# Altium PCB V1.0.pcbdoc
Units mil, origin at the board's own origin, x right, y up, seen from the top; angles counter-clockwise.
Board outline 3149.6 x 1850.4 mil, 2 copper layers (Top Layer, Bottom Layer), stack 62.2 mil thick; 47 components, 71 nets, 213 pads, 34 vias.
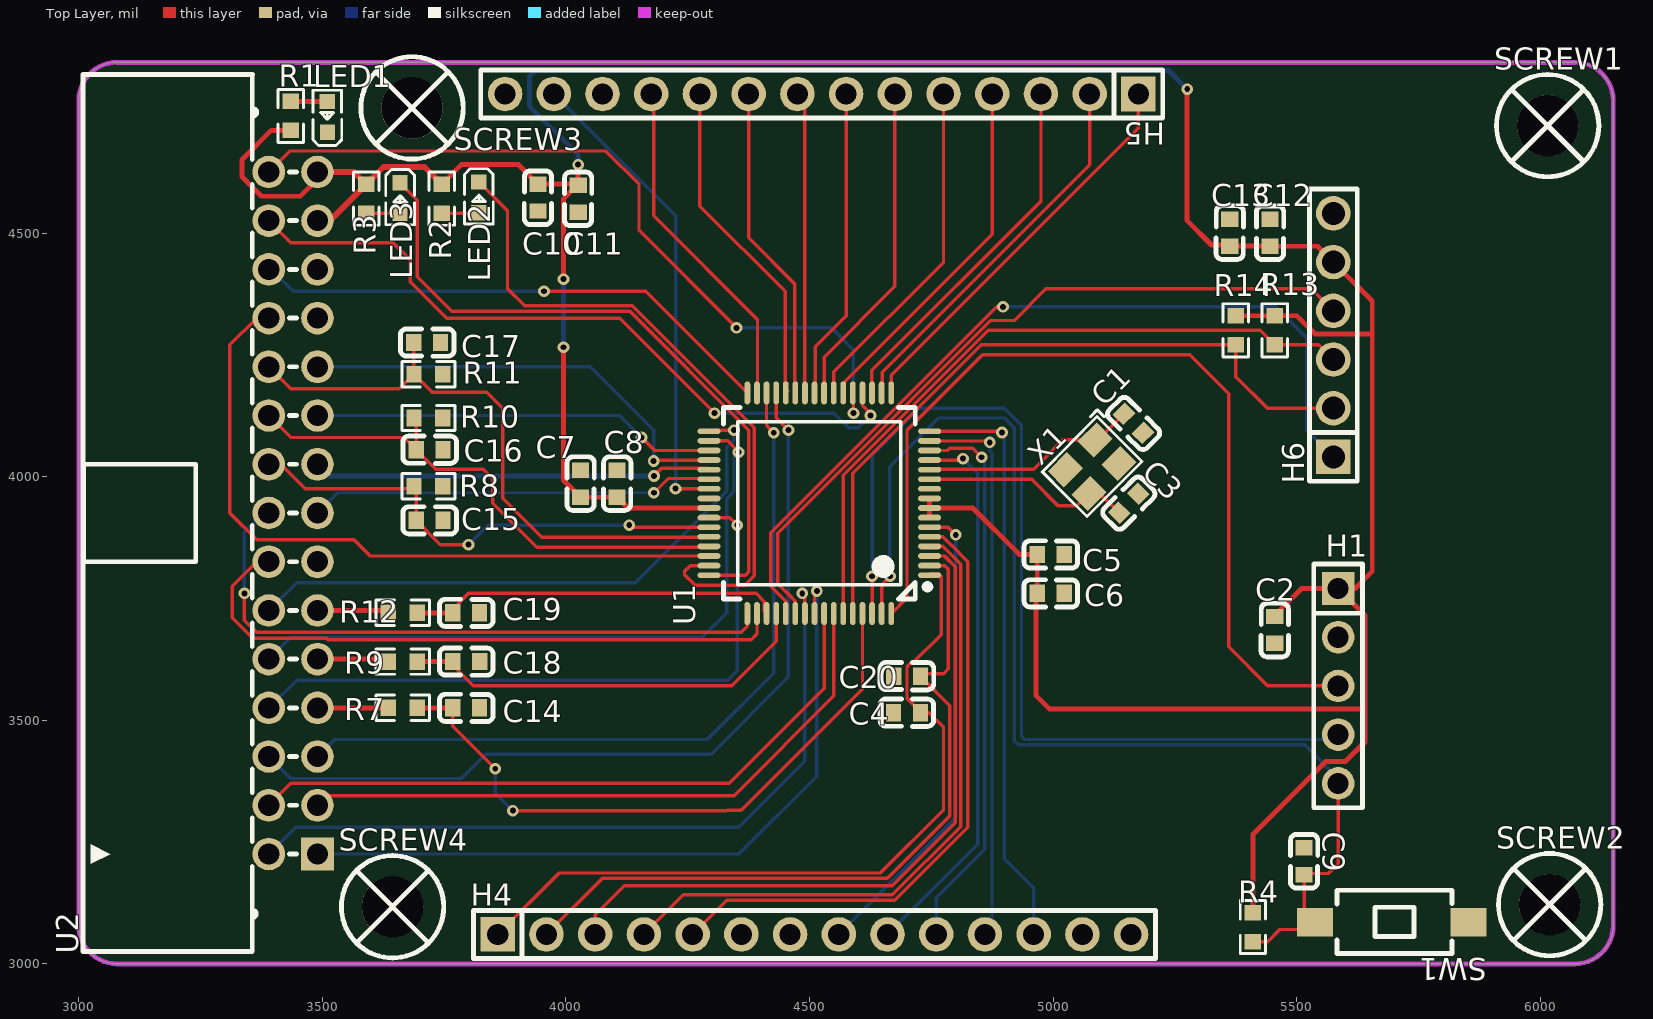
[diagram p0: Top Layer view]
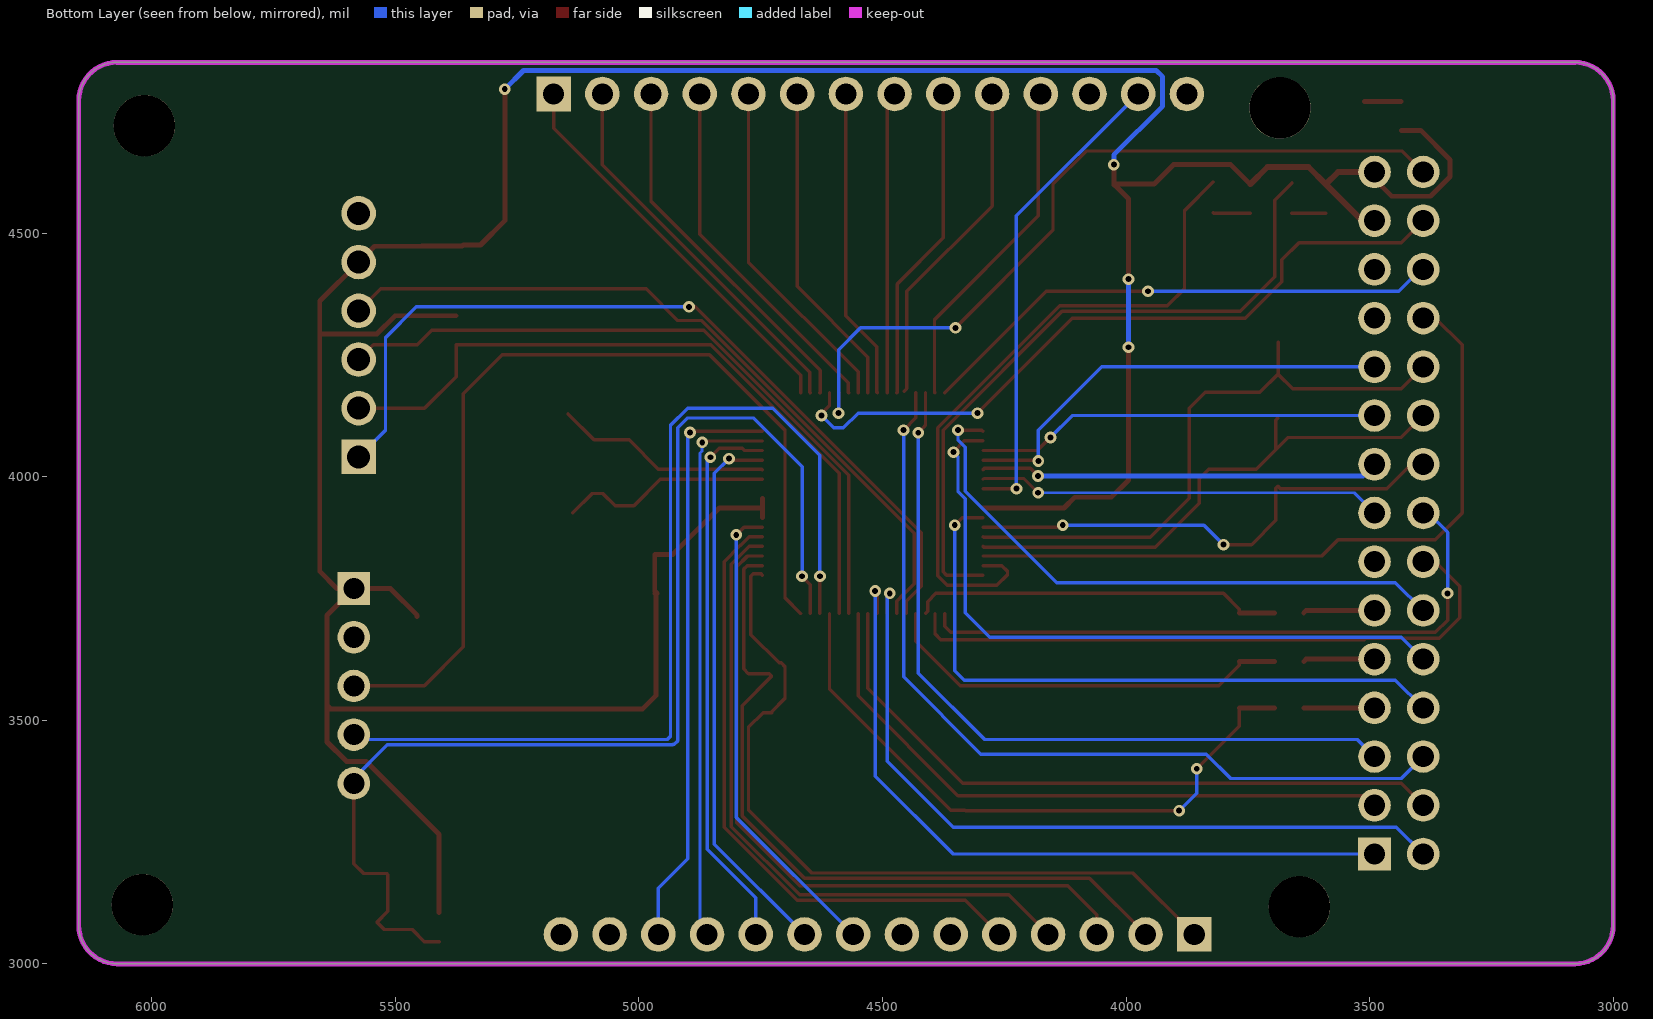
[diagram p1: Bottom Layer view, seen from below]

## Layer stack, top to bottom
Top Solder Mask Layer: solder mask 0.4, Dk 3.3
Top Layer: signal copper 1.4
Dielectric1: surface 59.4, FR4, Dk 4.5
Bottom Layer: signal copper 1.4
Bottom Solder Mask Layer: solder mask 0.4, Dk 3.3

## Board outline
3078.7,4850.4 ccw(c3078.7,4771.7) 3000,4771.7 3000,3078.7 ccw(c3078.7,3078.7) 3078.7,3000 6070.9,3000 ccw(c6070.9,3078.7) 6149.6,3078.7 6149.6,4771.7 ccw(c6070.9,4771.7) 6070.9,4850.4 3078.7,4850.4

## Design rules (kind name [scope] priority, off if disabled: settings)
BoardOutlineClearance copperThickness1oz [All] p0: genericclearance=10 ignorepadtopadclearanceinfootprint=FALSE except(0: Arc-SplitContinuation Track-SplitContinuation SMDPad-SplitContinuation THPad-SplitContinuation Via-SplitContinuation Fill-SplitContinuation Poly-SplitContinuation Region-SplitContinuation Text-SplitContinuation)
BoardOutlineClearance copperThickness2oz [All] p0: genericclearance=10 ignorepadtopadclearanceinfootprint=FALSE except(0: Arc-SplitContinuation Track-SplitContinuation SMDPad-SplitContinuation THPad-SplitContinuation Via-SplitContinuation Fill-SplitContinuation Poly-SplitContinuation Region-SplitContinuation Text-SplitContinuation)
BoardOutlineClearance otherClearance [All] p0: genericclearance=10 ignorepadtopadclearanceinfootprint=FALSE except(0: Arc-SplitContinuation Track-SplitContinuation SMDPad-SplitContinuation THPad-SplitContinuation Via-SplitContinuation Fill-SplitContinuation Poly-SplitContinuation Region-SplitContinuation Text-SplitContinuation)
Clearance copperThickness1oz [All] p1: gap=7 ignorepadtopadclearanceinfootprint=FALSE
Clearance copperThickness2oz [All] p1: gap=7 ignorepadtopadclearanceinfootprint=FALSE
Clearance otherClearance [All] p1: gap=7 ignorepadtopadclearanceinfootprint=FALSE
DiffPairsRouting differentialPair [All] p1: maxuncoupledlength=10 minlimit=6 maxlimit=Infinity mostfreqgap=6 toplayer_minwidth=5 toplayer_prefwidth=10 toplayer_maxwidth=100 bottomlayer_minwidth=5 bottomlayer_prefwidth=10 bottomlayer_maxwidth=100
PasteMaskExpansion pasteMaskExpansion [All] p1: expansion=0
PlaneConnect innerPlane [All] p1: planeconnectstyle=Relief reliefexpansion=20 reliefentries=4 reliefconductorwidth=10 reliefairgap=10
PolygonConnect copperRegion [All] p1: connectstyle=Relief reliefentries=4 reliefconductorwidth=10 polygonreliefangle="90 Angle" airgapwidth=10
RoutingVias viaSize [All] p1: viastyle="Through Hole" holewidth=12 minholewidth=6 maxholewidth=248.0314 width=12 minwidth=6 maxwidth=248.0314
SolderMaskExpansion solderMaskExpansion [IsVia] p1: useseparateexpansions=TRUE expansion=-1000 expansionbottom=-1000
SolderMaskExpansion solderMaskExpansion [All] p2: useseparateexpansions=TRUE expansion=2 expansionbottom=2
Width copperThickness1oz [All] p1: maxlimit=100 minlimit=5 preferedwidth=10
Width copperThickness2oz [All] p1: maxlimit=100 minlimit=8 preferedwidth=10

## Components (designator, comment, footprint, x,y, rotation, side; value= is the part's Value field where it differs from the comment)
C1 "100nF" C0603#1 5165,4109.4 r135 top
C2 "100nF" C0603#1 5455,3685.4 r90 top
C3 "100nF" C0603#1 5155,3945.4 r225 top
C4 "100nF" C0603#1 4700,3515.4 r0 top
C5 "100nF" C0603#1 4995,3840.4 r180 top
C6 "100nF" C0603#1 4995,3760.4 r180 top
C7 "100nF" C0603#1 4030,3985.4 r270 top
C8 "100nF" C0603#1 4105,3985.4 r270 top
C9 "100nF" C0603#1 5515,3210.4 r270 top
C10 "100nF" C0603#2 3942.6,4572.8 r90 top
C11 "100nF" C0603#1 4025,4570.4 r90 top
C12 "100nF" C0603#1 5445,4500.4 r270 top
C13 "100nF" C0603#3 5362.4,4500.6 r270 top
C14 "100nF" C0603#1 3795,3525.4 r180 top
C15 "100nF" C0603#1 3720,3910.4 r180 top
C16 "100nF" C0603#1 3720,4055.4 r180 top
C17 "100nF" C0603#1 3715,4275.4 r180 top
C18 "100nF" C0603#3 3795.1,3620.4 r180 top
C19 "100nF" C0603#1 3795,3720.4 r180 top
C20 "100nF" C0603#2 4700.1,3590.4 r0 top
H1 "" HDR-TH_5P-P2.54-V-M 5585,3570.4 r270 top
H4 "" HDR-TH_14P-P2.54-V-M 4510,3060.4 r0 top
H5 "" HDR-TH_14P-P2.54-V-M 4525,4785.4 r180 top
H6 "" HDR-TH_6P-P2.54-V-M-1 5575,4290.4 r90 top
LED1 "" LED_0603 3510,4740.4 r90 top
LED2 "" LED_0603 3821.2,4571.3 r270 top
LED3 "" LED_0603 3659.7,4569.7 r270 top
R1 "10K" R0603 3435,4740.4 r90 top
R2 "10K" R0603 3745,4570.4 r270 top
R3 "10K" R0603 3590,4570.4 r270 top
R4 "10K" R0603 5410,3075.4 r90 top
R7 "10K" R0603 3665,3525.4 r0 top
R8 "10K" R0603 3717.8,3980.4 r180 top
R9 "10K" R0603 3665,3620.4 r0 top
R10 "10K" R0603 3717.8,4120.4 r180 top
R11 "10K" R0603 3717.8,4210.4 r180 top
R12 "10K" R0603 3665,3720.4 r0 top
R13 "10K" R0603 5455,4300.4 r90 top
R14 "10K" R0603 5375,4300.4 r90 top
SCREW1 "" M3螺丝 6015,4720.4 r0 top
SCREW2 "" M3螺丝 6019.1,3121.5 r0 top
SCREW3 "" M3螺丝 3684.1,4756.8 r0 top
SCREW4 "" M3螺丝 3644.1,3117.2 r0 top
SW1 "TS-1101-C-W" SW-SMD_L6.0-W3.3-LS8.0 5695,3085.4 r180 top
U1 "" LQFP-64_L10.0-W10.0-P0.50-LS12.0-BL-2 4520,3945.4 r90 top
U2 "XDFH-0259-2*15P" CONN-TH_30P-P2.54_LX_XDFH-0259-2X15P 3440,3925.4 r90 top
X1 "8MHz" OSC-SMD_4P-L3.2-W2.5-BL 5080,4020.4 r225 top

## Footprints (in the part's own frame and the unit in brackets; to place one, negate y for a bottom-side part, rotate by r counter-clockwise, add the part's x,y. Pads: shape width x height; smd on the part's side, far side on the other; paste and mask are expansions set on the pad)
C0603#1 [mil]
  rect 31.5x35.4 smd: 1(-27.58,0) 2(27.58,0)
  silkscreen extent -55,-28 55,28
C0603#2 [mil]
  rect 31.5x35.4 smd: 1(-27.5,0) 2(27.6,0)
  silkscreen extent -55,-28 55,28
C0603#3 [mil]
  rect 31.5x35.4 smd: 1(-27.6,0) 2(27.5,0)
  silkscreen extent -55,-28 55,28
CONN-TH_30P-P2.54_LX_XDFH-0259-2X15P [mil]
  rect 66.9x66.9 hole 43.3: 1(-700,-50)
  round 66.9 hole 43.3: 2(-700,50) 3(-600,-50) 4(-600,50) 5(-500,-50) 6(-500,50) 7(-400,-50) 8(-400,50) 9(-300,-50) 10(-300,50) 11(-200,-50) 12(-200,50) 13(-100,-50) 14(-100,50) 15(0,-50) 16(0,50) 17(100,-50) 18(100,50) 19(200,-50) 20(200,50) 21(300,-50) 22(300,50) 23(400,-50) 24(400,50) 25(500,-50) 26(500,50) 27(600,-50) 28(600,50) 29(700,-50) 30(700,50)
  silkscreen extent -900,-7 900,432
HDR-TH_5P-P2.54-V-M [mil]
  rect 66.9x66.9 hole 43.3: 1(-200,0)
  round 66.9 hole 43.3: 2(-100,0) 3(0,0) 4(100,0) 5(200,0)
  silkscreen extent -250,-50 250,50
HDR-TH_6P-P2.54-V-M-1 [mil]
  rect 70.9x70.9 hole 47.2: 1(-250,0)
  round 70.9 hole 47.2: 2(-150,0) 3(-50,0) 4(50,0) 5(150,0) 6(250,0)
  silkscreen extent -300,-49 300,49
HDR-TH_14P-P2.54-V-M [mil]
  rect 70.9x70.9 hole 43.3: 1(-650,0)
  round 70.9 hole 43.3: 2(-550,0) 3(-450,0) 4(-350,0) 5(-250,0) 6(-150,0) 7(-50,0) 8(50,0) 9(150,0) 10(250,0) 11(350,0) 12(450,0) 13(550,0) 14(650,0)
  silkscreen extent -700,-49 700,49
LED_0603 [mil]
  rect 31.5x31.5 smd paste+0 mask+2: 1(-33.5,-0.4) 2(29.5,-0.2)
  silkscreen extent -61,-30 53,30
LQFP-64_L10.0-W10.0-P0.50-LS12.0-BL-2 [mil]
  oval 11.8x47.2 smd: 1(-147.6,-226.4) 2(-128,-226.4) 3(-108.3,-226.4) 4(-88.6,-226.4) 5(-68.9,-226.4) 6(-49.2,-226.4) 7(-29.5,-226.4) 8(-9.8,-226.4) 9(9.8,-226.4) 10(29.5,-226.4) 11(49.2,-226.4) 12(68.9,-226.4) 13(88.6,-226.4) 14(108.3,-226.4) 15(127.9,-226.4) 16(147.6,-226.4) 33(147.6,226.4) 34(127.9,226.4) 35(108.3,226.4) 36(88.6,226.4) 37(68.9,226.4) 38(49.2,226.4) 39(29.5,226.4) 40(9.8,226.4) 41(-9.8,226.4) 42(-29.5,226.4) 43(-49.2,226.4) 44(-68.9,226.4) 45(-88.6,226.4) 46(-108.3,226.4) 47(-128,226.4) 48(-147.6,226.4)
  oval 47.2x11.8 smd: 17(226.4,-147.6) 18(226.4,-127.9) 19(226.4,-108.3) 20(226.4,-88.6) 21(226.4,-68.9) 22(226.4,-49.2) 23(226.4,-29.5) 24(226.4,-9.8) 25(226.4,9.8) 26(226.4,29.5) 27(226.4,49.2) 28(226.4,68.9) 29(226.4,88.6) 30(226.4,108.3) 31(226.4,127.9) 32(226.4,147.6) 49(-226.4,147.6) 50(-226.4,127.9) 51(-226.4,108.3) 52(-226.4,88.6) 53(-226.4,68.9) 54(-226.4,49.2) 55(-226.4,29.5) 56(-226.4,9.8) 57(-226.4,-9.8) 58(-226.4,-29.5) 59(-226.4,-49.2) 60(-226.4,-68.9) 61(-226.4,-88.6) 62(-226.4,-108.3) 63(-226.4,-127.9) 64(-226.4,-147.6)
  silkscreen extent -197,-228 197,197
M3螺丝 [mil]
  round 126 hole 126 paste+0 mask+4: 1(0,0)
  silkscreen extent -105,-105 105,105
OSC-SMD_4P-L3.2-W2.5-BL [mil]
  rect 55.1x47.2 smd: 1(-43.35,-34.44) 2(43.35,-34.44) 3(43.35,34.44) 4(-43.35,34.44)
  silkscreen extent -90,-75 80,65
R0603 [mil]
  rect 31.8x34 smd paste-3937 mask+2: 1(-29.7,0) 2(29.7,0)
  silkscreen extent -54,-26 54,26
SW-SMD_L6.0-W3.3-LS8.0 [mil]
  rect 74.8x59.1 smd: 1(-157.5,0) 2(157.5,0)
  silkscreen extent -124,-66 113,64

## Via types
v1: diameter 24, hole 12, Top Layer to Bottom Layer, 34 vias

## Nets (pads, with @x,y where several pads share a name; then routed paths per layer and width w, separated by ;. In a path a pad name is that pad's centre, name@x,y a point inside that pad or via, vN(x,y) a via of type N, cw(c..) or ccw(c..) an arc to the next point about the centre after c; other vN are vias at no path point)
5V: C2.2 C5.2 C6.2 C7.2 C8.2 C10.2 C11.2 C12.2 C13.2 H1.1 H6.5 R1.1 R2.1 R3.1 R4.2 R13.2 R14.2 U1.7 U1.8 U1.9 U1.41 U2.27 U2.29 | length 7571.1
  Top Layer w10: R1.1 3395.3,4710.7 3335,4650.4 3335,4615.4 3375,4575.4 3455,4575.4 3490,4610.4 U2.29 ; R2.1 3785.3,4640.4 3902.6,4640.4 C10.2 4022.6,4600.4 C11.2 ; v1(3995,4265.4) 3995,3992.8 C7.2 C8.2 4127.3,3935.6 U1.41 ; v1(3995,4405.4) 3995,4570.4 4022.6,4598 C11.2 ; v1(4025,4640.4) C11.2 ; U1.7 U1.8 ; U1.9 U1.8 ; C6.2@4962.4,3760.4 C6.2@4964.9,3762.9 ; C6.2 4965,3758 4965,3550.4 4992.1,3523.3 5632.9,3523.3 5640,3530.4 ; C6.2@4967.4,3765.4 C5.2 4930,3840.4 4834.8,3935.6 U1.8 ; v1(5275.1,4795.3) 5275.1,4525.3 5325,4475.4 5360.1,4475.4 C13.2 5444.8,4473.1 C12.2 5542.6,4472.8 H6.5 5655,4360.4 5655,4293.1 ; R14.2 R13.2 5500.3,4330.1 5537.5,4292.9 5654.8,4292.9 5655,4293.1 ; R4.2 5410,3265.4 5560,3415.4 5600,3415.4 5640,3455.4 5640,3530.4 ; C2.2 5455,3715.4 5510,3770.4 H1.1 ; H1.1 5620,3770.4 5655,3805.4 5655,4293.1 ; H1.1 5640,3715.4 5640,3530.4
  Top Layer w12: U2.27 3515.3,4525.4 R3.1 ; U2.29 3564.7,4625.4 R3.1 ; R2.1 3709.7,4635.4 3625.3,4635.4 R3.1
  Bottom Layer w10: v1(3995,4265.4) v1(3995,4405.4) ; v1(4025,4640.4) 4025,4660.4 3925,4760.4 3925,4820.4 3938.2,4833.6 5236.8,4833.6 v1(5275.1,4795.3)
$1N1119: LED1.2 R1.2 | length 75.3
  Top Layer w10: R1.2 3510,4770.1 LED1.2
$1N2766: H5.12
$1N6410: U2.13
$1N6978: H4.13
$1N6985: H4.6
$1N6986: H4.7
$1N13909: LED2.2 R2.2 | length 76.4
  Top Layer w7: R2.2 3819.8,4540.7 LED2.2@3820.9,4541.8
$1N13949: LED3.2 R3.2 | length 69.7
  Top Layer w7: R3.2 3659,4540.7 LED3.2
CAN_RX: U1.21 U2.30 | length 1614.2
  Top Layer w7: U2.30 3432.9,4668.3 4082.1,4668.3 4150,4600.4 4150,4505.4 v1(4350,4305.4) ; U1.21 4590,4170.7 v1(4590,4130.4)
  Bottom Layer w7: v1(4350,4305.4) 4545,4305.4 4590,4260.4 v1(4590,4130.4)
CAN_TX: U1.20 U2.28 | length 1500.9
  Top Layer w7: U2.28 3435,4480.4 3645,4480.4 3680,4445.4 3680,4400.4 3755,4325.4 4110,4325.4 v1(4305,4130.4) ; U1.20 4608.6,4146.8 4625,4130.4 v1(4625,4125.4)
  Bottom Layer w7: v1(4305,4130.4) 4550,4130.4 4580,4100.4 4600,4100.4 v1(4625,4125.4)
CLK: H1.4 U1.62 | length 1981
  Top Layer w7: U1.62 v1(4628.3,3795.4)
  Bottom Layer w7: v1(4628.3,3795.4) 4628.3,4043.7 4725,4140.4 4900,4140.4 4935,4105.4 4935,3467.4 4942,3460.4 5575,3460.4 H1.4
DIO: H1.3 U1.64 | length 1925.3
  Top Layer w7: U1.64 4700,3751.4 4700,4095.4 4855,4250.4 5280,4250.4 5360,4170.4 5360,3650.4 5440,3570.4 H1.3
EXTAL: C3.2 U1.11 X1.3 | length 438.3
  Top Layer w7: U1.11 4955.8,3994.6 5010,3940.4 5048.7,3940.4 X1.3 5096,3965.4 C3.2
GND: C1.1 C2.1 C3.1 C4.1 C5.1 C6.1 C7.1 C8.1 C9.1 C10.1 C11.1 C12.1 C13.1 C14.1 C15.1 C16.1 C17.1 C18.1 C19.1 C20.1 H1.2 H4.14 H5.14 H6.6 LED1.1 R8.1 R10.1 R11.1 SW1.1 U1.10 U1.40 U2.23 U2.25 X1.2 X1.4
HALL1: C14.2 R7.2 U1.61 | length 1310.9
  Top Layer w7: C14.2 3767.4,3488 v1(3855,3400.4) ; v1(3891,3314.4) 4329.6,3314.4 4330.6,3315.4 4360,3315.4 4608.6,3564 U1.61
  Top Layer w10: R7.2 C14.2
  Bottom Layer w7: v1(3855,3400.4) 3855,3350.4 v1(3891,3314.4)
HALL2: C18.2 R9.2 U1.52 | length 856.9
  Top Layer w7: C18.2 3767.6,3612.8 3810,3570.4 4340,3570.4 4431.4,3661.8 U1.52
  Top Layer w10: R9.2 C18.2
HALL3: C19.2 R12.2 U1.51 | length 766.7
  Top Layer w7: C19.2 3767.4,3727.8 3800,3760.4 4390.2,3760.4 4407.4,3743.1 4407.4,3723.3 U1.51
  Top Layer w10: R12.2 C19.2
HU: R7.1 U2.7 | length 145.3
  Top Layer w10: U2.7 R7.1
HV: R9.1 U2.9 | length 147.4
  Top Layer w10: U2.9 3630.3,3625.4 R9.1
HW: R12.1 U2.11 | length 147.4
  Top Layer w10: U2.11 3630.3,3725.4 R12.1
IBUS: U1.50 U2.14 | length 1303
  Top Layer w7: U2.14 3365,3825.4 3315,3775.4 3315,3710.4 3357.1,3668.3 3507.8,3668.3 3510.7,3665.4 4380,3665.4 4392.1,3677.4 U1.50
IU: U1.42 U2.8 | length 1356
  Top Layer w7: U1.42 4336,3915.9 v1(4351.5,3900.4)
  Bottom Layer w7: U2.8 3447.1,3582.4 4332.1,3582.4 4351.5,3601.9 v1(4351.5,3900.4)
IV: U1.34 U2.10 | length 1389.8
  Top Layer w7: U1.34 4332.1,4073.3 4354,4051.4 v1(4354,4050.2)
  Bottom Layer w7: U2.10 3435,3670.4 4280,3670.4 4330,3720.4 4330,3954.8 4345,3969.8 4345,4041.2 v1(4354,4050.2)
IW: U1.33 U2.12 | length 1225.1
  Top Layer w7: U1.33 4296,4095.4 v1(4345,4095.4)
  Bottom Layer w7: U2.12 3447.1,3782.4 4142.1,3782.4 4330,3970.4 4330,4060.4 4345,4075.4 v1(4345,4095.4)
LED1: LED2.1 U1.47 | length 1394.1
  Top Layer w7: LED2.1 3880,4545.6 3880,4385.4 3915,4350.4 4136,4350.4 4386.5,4099.9 4386.5,3796.9 4366.7,3777.1 4265,3777.1 4243.3,3798.7 4243.3,3805.7 4255.1,3817.4 U1.47
LED2: LED3.1 U1.48 | length 1393.9
  Top Layer w7: LED3.1 3695,4567.5 3695,4410.4 3766,4339.4 4131.4,4339.4 4375.5,4095.3 4375.5,3804.8 4368.5,3797.8 U1.48
NRST: C9.2 H1.5 R4.1 SW1.2 U1.63 | length 2458.1
  Top Layer w7: U1.63 4647.9,3778.3 v1(4665,3795.4) ; R4.1 5440.3,3045.7 5465,3070.4 5522.5,3070.4 SW1.2 5515,3107.9 C9.2 5517.6,3185.4 5565,3185.4 5585,3205.4 H1.5
  Bottom Layer w7: v1(4665,3795.4) 4665,4020.4 4765,4120.4 4900,4120.4 4920,4100.4 4920,3457.4 4927,3450.4 4929.4,3450.4 4930.4,3449.4 5516,3449.4 5585,3380.4 H1.5
PB3: H5.11 U1.31 | length 704.4
  Top Layer w7: H5.11 4180,4780.4 4180,4535.4 4393.1,4322.3 4393.1,4172.8 U1.31
PB4: H5.3 U1.19 | length 757.9
  Top Layer w7: U1.19 4627.5,4172.5 4627.5,4217.9 4975,4565.4 H5.3
PB5: H5.2 U1.18 | length 790.5
  Top Layer w7: U1.18 4649.1,4172.9 4649.1,4214.4 5075,4640.4 H5.2
PC0: H5.8 U1.26 | length 620.1
  Top Layer w7: H5.8 4490,4770.4 4490,4172.2 U1.26
PC1: H5.7 U1.25 | length 640.4
  Top Layer w7: U1.25 4511.4,4173 4511.4,4266.8 4575,4330.4 H5.7
PC16: H5.10 U1.28 | length 684.7
  Top Layer w7: H5.10 4275,4555.4 4450,4380.4 4450,4180.8 U1.28@4455.4,4175.4
PC17: H5.9 U1.27 | length 653.3
  Top Layer w7: H5.9 4375,4490.4 4470,4395.4 4470,4172.6 U1.27
PD5: H5.6 U1.24 | length 673.7
  Top Layer w7: U1.24 4529.8,4245.2 4675,4390.4 H5.6
PD6: H5.5 U1.23 | length 707
  Top Layer w7: U1.23 4549.5,4214.9 4775,4440.4 H5.5
PD7: H5.4 U1.22 | length 740.3
  Top Layer w7: U1.22 4570,4172.6 4570,4192.3 4875,4497.3 H5.4
PD15: H4.11 U1.15 | length 1142.4
  Top Layer w6: U1.15 4867.1,4073.3 v1(4870,4070.4)
  Bottom Layer w6: H4.11 4874.2,3074.6 4874.2,4048.5 4870,4052.7 v1(4870,4070.4)
PD16: H4.10 U1.14 | length 1140.1
  Top Layer w7: U1.14 4783.3,4053.7 4788,4058.4 4834.6,4058.4 v1(4853.2,4039.8)
  Bottom Layer w7: H4.10 4760,3135.4 4860,3235.4 4860,4033 v1(4853.2,4039.8)
PE3: H4.9 U1.13 | length 1135.4
  Top Layer w7: U1.13 4812.1,4034 v1(4815,4036.9)
  Bottom Layer w7: H4.9 4845,3245.4 4845,4006.9 v1(4815,4036.9)
PE4: H4.8 U1.6 | length 979.6
  Top Layer w7: U1.6 4784.2,3896.2 v1(4800,3880.4)
  Bottom Layer w7: H4.8 4800,3300.4 v1(4800,3880.4)
PE5: H4.5 U1.5 | length 1300.9
  Top Layer w7: H4.5 4330,3130.4 4675,3130.4 4825,3280.4 4825,3825.4 4791.5,3858.9 4791.1,3858.9 4773.5,3876.5 U1.5
PE7: H5.13 U1.39 | length 982.4
  Top Layer w7: v1(4225,3975.4) 4225.5,3974.9 U1.39
  Bottom Layer w7: H5.13 4225,4535.4 v1(4225,3975.4)
PE8: H5.1 U1.17 | length 823.8
  Top Layer w7: U1.17 4667.6,4208 5175,4715.4 H5.1
PE9: H4.12 U1.16 | length 1206.6
  Top Layer w7: U1.16 4892.4,4093 v1(4895,4090.4)
  Bottom Layer w7: v1(4895,4090.4) 4900,4085.4 4900,3215.4 4960,3155.4 H4.12
PE10: H4.4 U1.4 | length 1359
  Top Layer w7: H4.4 4241,3141.4 4669.7,3141.4 4810,3281.7 4810,3820.4 4773.6,3856.8 U1.4
PE11: H4.3 U1.3 | length 1444.7
  Top Layer w7: H4.3 4060,3100.4 4120,3160.4 4670,3160.4 4799,3289.4 4799,3815.1 4777,3837.1 U1.3
PU: C15.2 R8.2 U1.43 U2.18 | length 1032.9
  Top Layer w7: U2.18 3415,4025.4 3465,3975.4 3683.1,3975.4 R8.2 3692.4,3976.1 C15.2 3742.4,3860.4 v1(3800,3860.4) ; v1(4130,3900.4) 4134.2,3896.2 U1.43
  Bottom Layer w7: v1(3800,3860.4) 3840,3900.4 v1(4130,3900.4)
PV: C16.2 R10.2 U1.45 U2.20 | length 1112.1
  Top Layer w7: U2.20 3435,4080.4 3667.4,4080.4 C16.2 ; R10.2 3692.4,4116.1 C16.2 ; U1.45 4292.2,3855.4 3940,3855.4 3850,3945.4 3850,3995.4 3830,4015.4 3732.4,4015.4 C16.2
PW: C17.2 R11.2 U1.44 U2.22 | length 1247.5
  Top Layer w7: U2.22 3435,4180.4 3658.1,4180.4 R11.2 ; C17.2 3687.4,4211.1 R11.2 ; U1.44 4292.5,3875.4 3950,3875.4 3870,3955.4 3870,4140.4 3837.2,4173.2 3725.4,4173.2 R11.2
SPI_CS: H6.1 U1.53 | length 1764.5
  Top Layer w7: U1.53 4451.1,3744.3 4420,3775.4 4420,3884.6 4883.8,4348.4 v1(4897,4348.4)
  Bottom Layer w7: v1(4897,4348.4) 5457,4348.4 5520,4285.4 5520,4095.4 H6.1
SPI_SCK: H6.2 R14.1 U1.60 | length 1475.4
  Top Layer w7: U1.60 4588.9,4006.8 4852.8,4270.7 R14.1 5375,4205.4 5440,4140.4 H6.2
SPI_SIN: H6.3 R13.1 U1.59 | length 1437.7
  Top Layer w7: U1.59 4569.2,4002.7 4866.9,4300.4 5425.3,4300.4 R13.1 5544.7,4270.7 H6.3
SPI_SOUT: H6.4 U1.54 | length 1546.2
  Top Layer w7: U1.54 4470.8,3744.2 4463.5,3751.5 4463.5,3751.9 4435,3780.4 4435,3884.1 4871.3,4320.4 4920,4320.4 4985,4385.4 5530,4385.4 H6.4
SPIN: U1.46 U2.24 | length 1468
  Top Layer w7: U2.24 3365,4325.4 3310,4270.4 3310,3925.4 3365,3870.4 3565,3870.4 3598.3,3837.1 U1.46
START: U1.38 U2.15 | length 833.8
  Top Layer w6: v1(4180.5,3966.9) 4210,3996.4 4291.9,3996.4 U1.38
  Bottom Layer w6: U2.15 3531.5,3966.9 v1(4180.5,3966.9)
STOP: U1.37 U2.17 | length 821
  Top Layer w7: v1(4180.6,4001.4) 4196.1,4016.9 4291,4016.9 U1.37
  Bottom Layer w10: U2.17 3514,4001.4 v1(4180.6,4001.4)
TEMP: U1.32 U2.26 | length 1087.4
  Top Layer w7: v1(3955,4380.4) 4163.7,4380.4 U1.32
  Bottom Layer w7: U2.26 3395,4425.4 3440,4380.4 v1(3955,4380.4)
UART_RX: U1.36 U2.21 | length 921.4
  Top Layer w7: v1(4180,4032.2) 4181.8,4034 U1.36
  Bottom Layer w7: U2.21 4050,4225.4 4180,4095.4 v1(4180,4032.2)
UART_TX: U1.35 U2.19 | length 833.3
  Top Layer w7: v1(4155,4080.4) 4181.7,4053.7 U1.35
  Bottom Layer w7: U2.19 4110,4125.4 v1(4155,4080.4)
UN: U1.55 U2.2 | length 1569.4
  Top Layer w7: v1(4485,3760.4) 4490.5,3754.9 U1.55
  Bottom Layer w7: U2.2 3445,3280.4 4355,3280.4 4490,3415.4 4490,3755.4 v1(4485,3760.4)
UP: U1.56 U2.1 | length 1519.7
  Top Layer w7: U1.56 4510.2,3760.6 v1(4515,3765.4)
  Bottom Layer w7: U2.1 4355,3225.4 4515,3385.4 v1(4515,3765.4)
VBUS: U1.49 U2.16 | length 1320.7
  Top Layer w7: v1(3340,3760.4) 3340,3705.4 3365,3680.4 4360,3680.4 4372.4,3692.8 U1.49
  Bottom Layer w7: v1(3340,3760.4) 3340,3885.4 3380,3925.4 U2.16
VDD15: C4.2 H4.1 U1.1 | length 1599.4
  Top Layer w7: H4.1 3986,3186.4 4645,3186.4 4775,3316.4 4775,3485.4 4745,3515.4 C4.2 4727.6,3517.8 4700,3545.4 4700,3609.6 4708,3617.6 4712.2,3617.6 4770,3675.4 4770,3795.4 4765.1,3800.3 4749,3800.3 U1.1
VDD25: C20.2 H4.2 U1.2 | length 1550.6
  Top Layer w7: H4.2 4075,3175.4 4660,3175.4 4788,3303.4 4788,3530.1 C20.2 4732.7,3595.4 4775,3595.4 4785,3605.4 4785,3810.4 4777.9,3817.4 U1.2
VN: U1.57 U2.4 | length 1392.9
  Top Layer w7: U2.4 3435,3370.4 4335,3370.4 4529.8,3565.2 U1.57
VP: U1.58 U2.3 | length 1321.6
  Top Layer w7: U2.3 3510,3345.4 4345,3345.4 4549.5,3549.9 U1.58
WN: U1.29 U2.6 | length 1765
  Top Layer w7: U1.29 4431.4,4120.6 v1(4456.6,4095.4)
  Bottom Layer w7: U2.6 3435,3380.4 3785,3380.4 3835,3430.4 4298.2,3430.4 4456.6,3588.8 v1(4456.6,4095.4)
WP: U1.30 U2.5 | length 1588.9
  Top Layer w7: U1.30 4411.7,4104.9 4416.6,4100 ; 4416.6,4100.4 4416.6,4100 ; v1(4426.4,4090.2) 4416.6,4100
  Bottom Layer w7: U2.5 3525,3460.4 4290,3460.4 4426.4,3596.8 v1(4426.4,4090.2)
XTAL: C1.2 U1.12 X1.1 | length 446.6
  Top Layer w7: U1.12 4747.5,4015.4 4960,4015.4 5020,4075.4 X1.1 5092,4075.4 C1.2
pads on no net: SCREW1.1 SCREW2.1 SCREW3.1 SCREW4.1

## Keep-outs
Board Outline Layer:
  lines w10: 3000,3078.7 3000,4771.7 cw(c3078.7,4771.7) 3078.7,4850.4 6070.9,4850.4 cw(c6070.9,4771.7) 6149.6,4771.7 6149.6,3078.7 cw(c6070.9,3078.7) 6070.9,3000 3078.7,3000 cw(c3078.7,3078.7) 3000,3078.7 ; 3000,3078.7 3000,3078.7